# Altium PCB ledcube_v2.PcbDoc (part 16 of 18)
Units mil, origin at the board's own origin, x right, y up, seen from the top; angles counter-clockwise.
Board outline 3130 x 3300 mil, 2 copper layers (Top Layer, Bottom Layer); 188 components, 216 nets, 29515 pads, 250 vias.
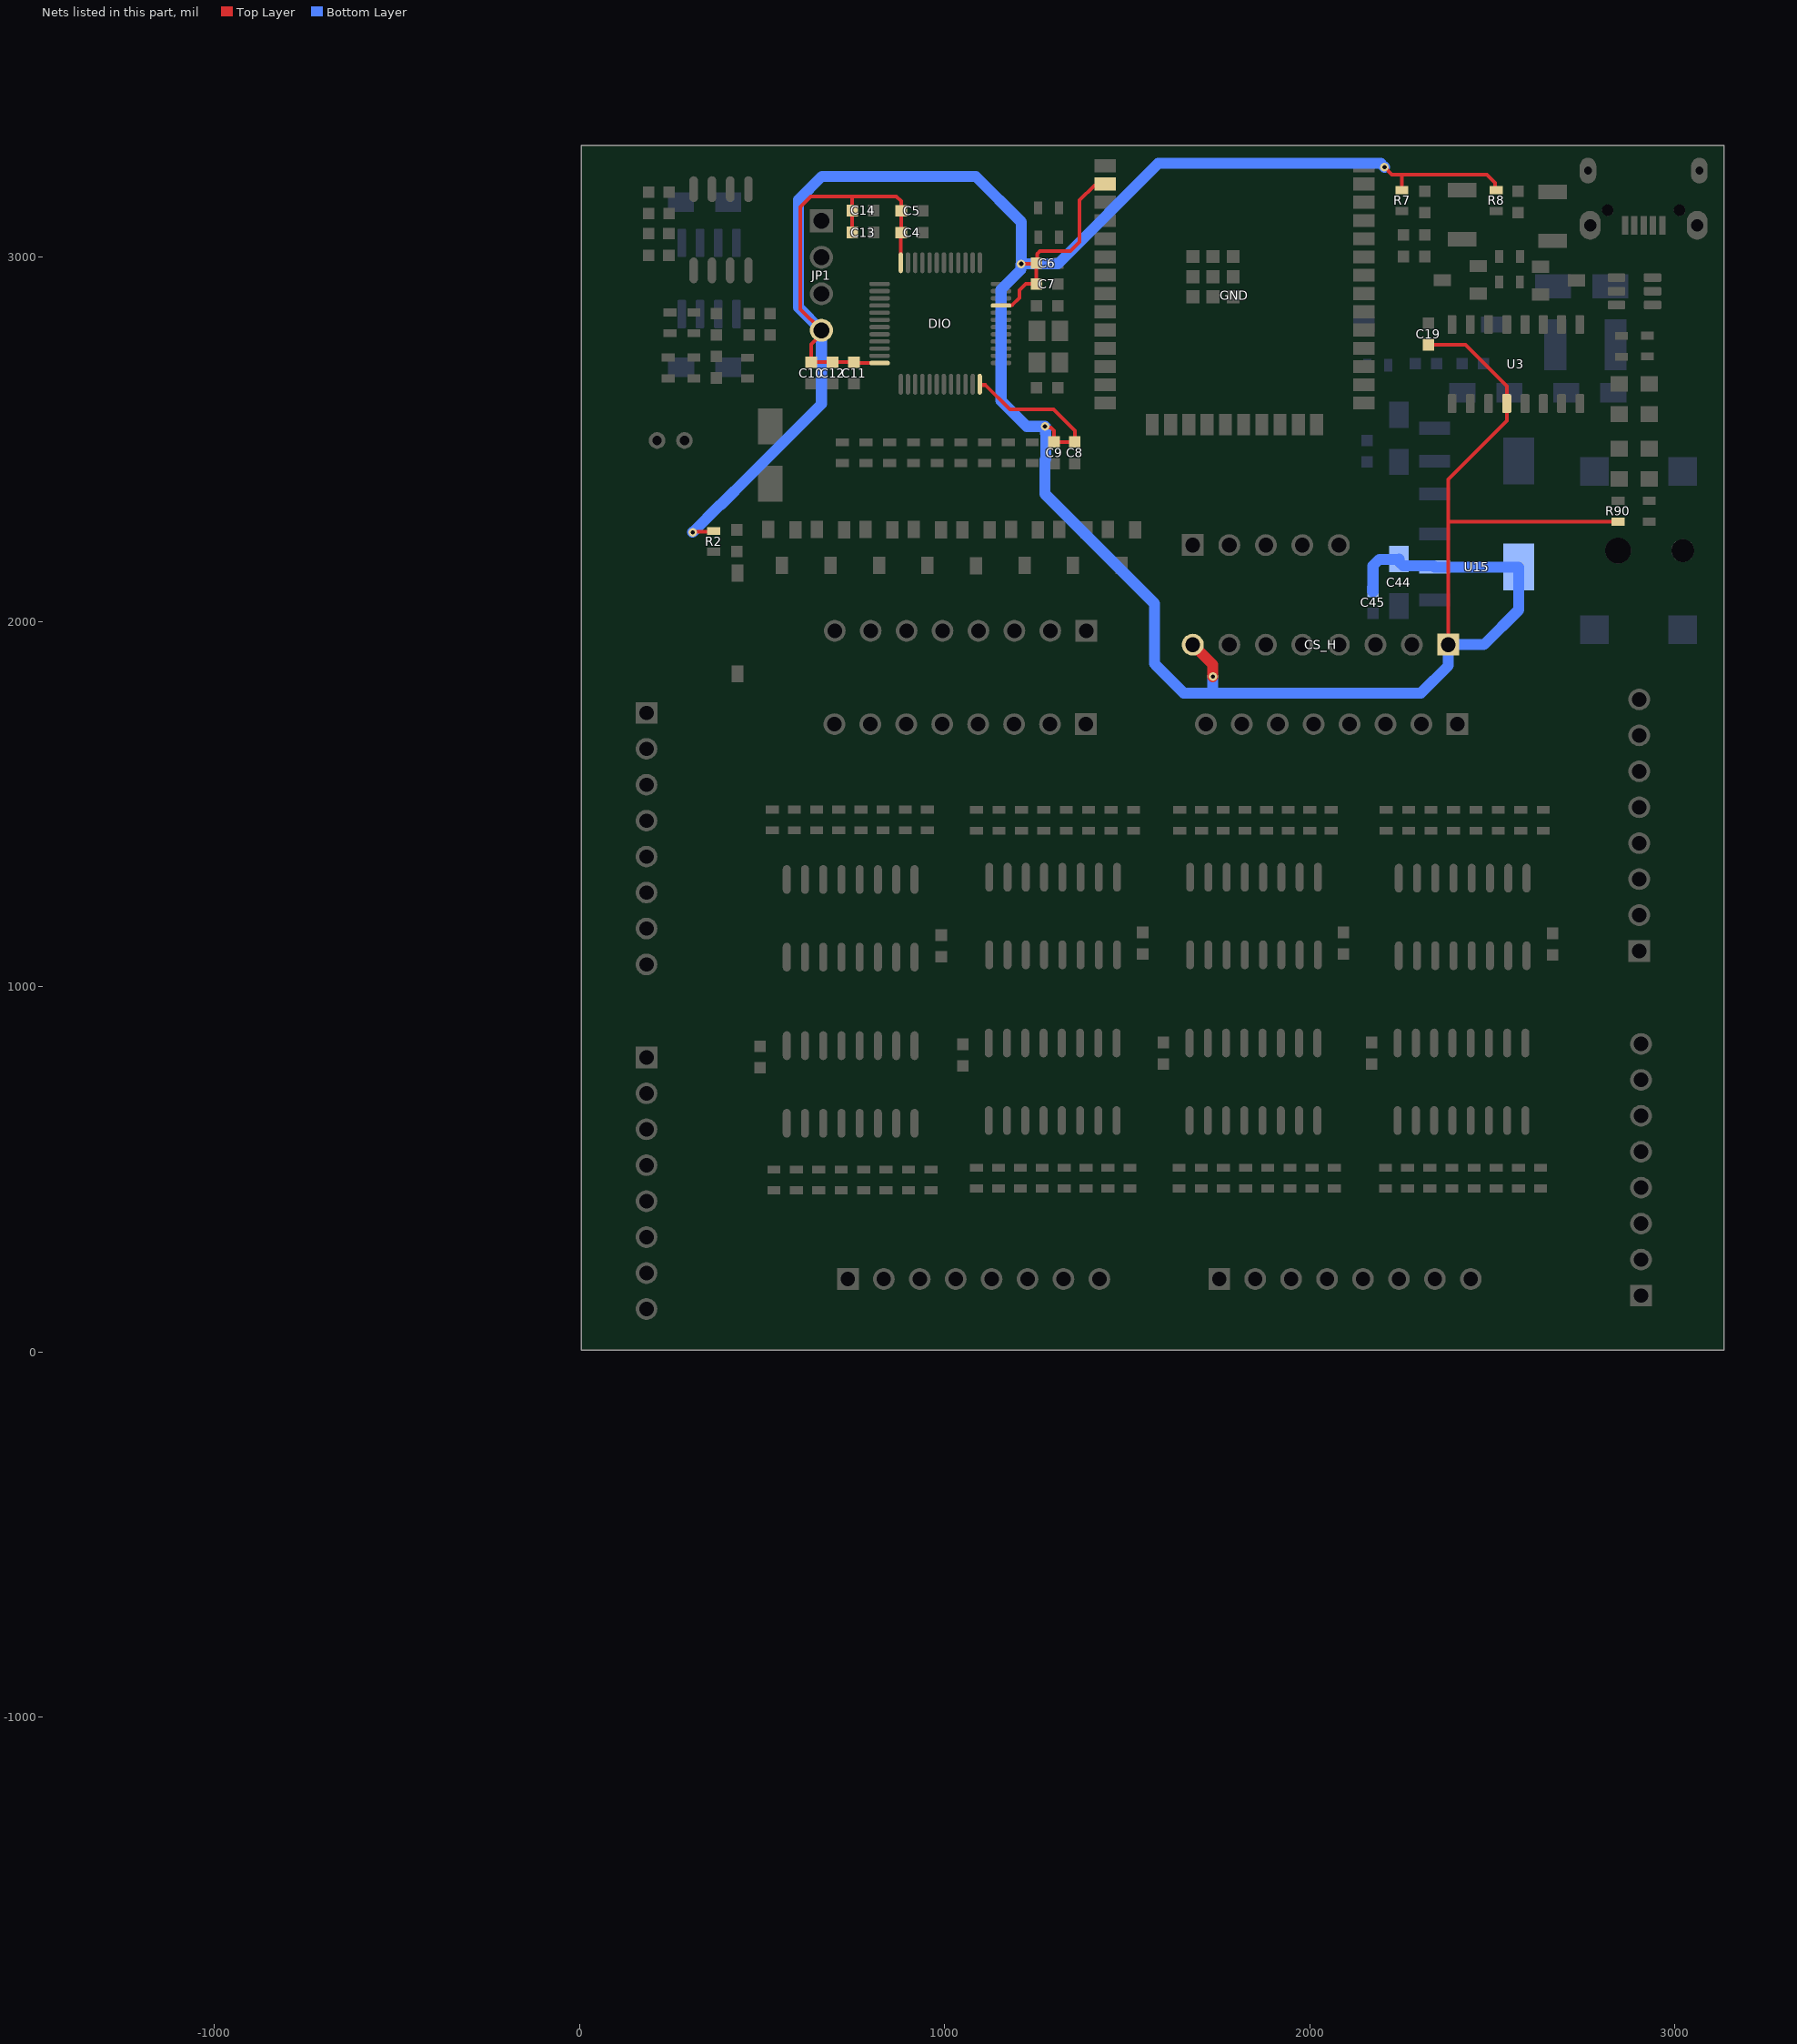
[diagram p15: the nets of this part, all layers, seen from the top]

## Free pads (board coordinates) (continued)
  round 0 on Mech16: 1(-1371.52,-1737.2) 1(-1371.52,-1737.2) 1(-1371.52,-1737.17) 1(-1371.52,-1737.17) 1(-1371.52,-1737.16) 1(-1371.52,-1737.16) 1(-1371.52,-1737.17) 1(-1371.52,-1737.17) 1(-1371.52,-1737.2) 1(-1371.52,-1737.2) 1(-1371.52,-1737.15) 1(-1371.52,-1737.15) 1(-1371.52,-1737.21) 1(-1371.52,-1737.21) 1(-1371.52,-1737.24) 1(-1371.52,-1737.24) 1(-1371.52,-1737.21) 1(-1371.52,-1737.21) 1(-1371.52,-1737.23) 1(-1371.52,-1737.23) 1(-1371.52,-1737.23) 1(-1371.52,-1737.23) 1(-1371.52,-1737.23) 1(-1371.52,-1737.23) 1(-1371.52,-1737.26) 1(-1371.52,-1737.26) 1(-1371.52,-1737.26) 1(-1371.52,-1737.26) 1(-1371.52,-1737.25) 1(-1371.52,-1737.25) 1(-1371.52,-1737.19) 1(-1371.52,-1737.19) 1(-1371.52,-1737.18) 1(-1371.52,-1737.18) 1(-1371.52,-1737.22) 1(-1371.52,-1737.22) 1(-1371.52,-1737.21) 1(-1371.52,-1737.21) 1(-1371.52,-1737.21) 1(-1371.52,-1737.21) 1(-1371.52,-1737.2) 1(-1371.52,-1737.2) 1(-1371.52,-1737.16) 1(-1371.52,-1737.16) 1(-1371.52,-1737.17) 1(-1371.52,-1737.17) 1(-1371.52,-1737.21) 1(-1371.52,-1737.21) 1(-1371.52,-1737.23) 1(-1371.52,-1737.23) 1(-1371.52,-1737.22) 1(-1371.52,-1737.22) 1(-1371.52,-1737.2) 1(-1371.52,-1737.2) 1(-1371.52,-1737.19) 1(-1371.52,-1737.19) 1(-1371.52,-1737.18) 1(-1371.52,-1737.18) 1(-1371.52,-1737.16) 1(-1371.52,-1737.16) 1(-1371.52,-1737.24) 1(-1371.52,-1737.24) 1(-1371.52,-1737.16) 1(-1371.52,-1737.16) 1(-1371.52,-1737.21) 1(-1371.52,-1737.21) 1(-1371.52,-1737.2) 1(-1371.52,-1737.2) 1(-1371.52,-1737.26) 1(-1371.52,-1737.26) 1(-1371.52,-1737.26) 1(-1371.52,-1737.26) 1(-1371.51,-1737.21) 1(-1371.51,-1737.21) 1(-1371.51,-1737.23) 1(-1371.51,-1737.23) 1(-1371.51,-1737.16) 1(-1371.51,-1737.16) 1(-1371.51,-1737.26) 1(-1371.51,-1737.26) 1(-1371.51,-1737.26) 1(-1371.51,-1737.26) 1(-1371.51,-1737.22) 1(-1371.51,-1737.22) 1(-1371.51,-1737.18) 1(-1371.51,-1737.18) 1(-1371.51,-1737.24) 1(-1371.51,-1737.24) 1(-1371.51,-1737.2) 1(-1371.51,-1737.2) 1(-1371.51,-1737.19) 1(-1371.51,-1737.19) 1(-1371.51,-1737.19) 1(-1371.51,-1737.19) 1(-1371.51,-1737.17) 1(-1371.51,-1737.17) 1(-1371.51,-1737.21) 1(-1371.51,-1737.21) 1(-1371.51,-1737.19) 1(-1371.51,-1737.19) 1(-1371.51,-1737.18) 1(-1371.51,-1737.18) 1(-1371.51,-1737.25) 1(-1371.51,-1737.25) 1(-1371.51,-1737.17) 1(-1371.51,-1737.17) 1(-1371.51,-1737.26) 1(-1371.51,-1737.26) 1(-1371.51,-1737.16) 1(-1371.51,-1737.16) 1(-1371.51,-1737.22) 1(-1371.51,-1737.22) 1(-1371.51,-1737.19) 1(-1371.51,-1737.19) 1(-1371.51,-1737.25) 1(-1371.51,-1737.25) 1(-1371.51,-1737.21) 1(-1371.51,-1737.21) 1(-1371.51,-1737.2) 1(-1371.51,-1737.2) 1(-1371.51,-1737.19) 1(-1371.51,-1737.19) 1(-1371.51,-1737.18) 1(-1371.51,-1737.18) 1(-1371.51,-1737.26) 1(-1371.51,-1737.26) 1(-1371.51,-1737.26) 1(-1371.51,-1737.26) 1(-1371.51,-1737.18) 1(-1371.51,-1737.18) 1(-1371.51,-1737.15) 1(-1371.51,-1737.15) 1(-1371.51,-1737.21) 1(-1371.51,-1737.21) 1(-1371.51,-1737.2) 1(-1371.51,-1737.2) 1(-1371.51,-1737.19) 1(-1371.51,-1737.19) 1(-1371.51,-1737.19) 1(-1371.51,-1737.19) 1(-1371.51,-1737.17) 1(-1371.51,-1737.17) 1(-1371.51,-1737.21) 1(-1371.51,-1737.21) 1(-1371.51,-1737.26) 1(-1371.51,-1737.26) 1(-1371.51,-1737.18) 1(-1371.51,-1737.18) 1(-1371.51,-1737.25) 1(-1371.51,-1737.25) 1(-1371.51,-1737.18) 1(-1371.51,-1737.18) 1(-1371.51,-1737.16) 1(-1371.51,-1737.16) 1(-1371.51,-1737.19) 1(-1371.51,-1737.19) 1(-1371.51,-1737.17) 1(-1371.51,-1737.17) 1(-1371.51,-1737.15) 1(-1371.51,-1737.15) 1(-1371.51,-1737.26) 1(-1371.51,-1737.26) 1(-1371.51,-1737.18) 1(-1371.51,-1737.18) 1(-1371.51,-1737.19) 1(-1371.51,-1737.19) 1(-1371.51,-1737.19) 1(-1371.51,-1737.19) 1(-1371.51,-1737.22) 1(-1371.51,-1737.22) 1(-1371.51,-1737.18) 1(-1371.51,-1737.18) 1(-1371.51,-1737.17) 1(-1371.51,-1737.17) 1(-1371.51,-1737.26) 1(-1371.51,-1737.26) 1(-1371.51,-1737.21) 1(-1371.51,-1737.21) 1(-1371.51,-1737.21) 1(-1371.51,-1737.21) 1(-1371.51,-1737.19) 1(-1371.51,-1737.19) 1(-1371.51,-1737.2) 1(-1371.51,-1737.2) 1(-1371.51,-1737.18) 1(-1371.51,-1737.18) 1(-1371.51,-1737.18) 1(-1371.51,-1737.18) 1(-1371.51,-1737.16) 1(-1371.51,-1737.16) 1(-1371.51,-1737.19) 1(-1371.51,-1737.19) 1(-1371.51,-1737.17) 1(-1371.51,-1737.17) 1(-1371.51,-1737.18) 1(-1371.51,-1737.18) 1(-1371.51,-1737.26) 1(-1371.51,-1737.26) 1(-1371.51,-1737.18) 1(-1371.51,-1737.18) 1(-1371.51,-1737.18) 1(-1371.51,-1737.18) 1(-1371.51,-1737.19) 1(-1371.51,-1737.19) 1(-1371.51,-1737.16) 1(-1371.51,-1737.16) 1(-1371.51,-1737.21) 1(-1371.51,-1737.21) 1(-1371.51,-1737.21) 1(-1371.51,-1737.21) 1(-1371.51,-1737.16) 1(-1371.51,-1737.16) 1(-1371.51,-1737.17) 1(-1371.51,-1737.17) 1(-1371.51,-1737.18) 1(-1371.51,-1737.18) 1(-1371.51,-1737.19) 1(-1371.51,-1737.19) 1(-1371.51,-1737.2) 1(-1371.51,-1737.2) 1(-1371.51,-1737.16) 1(-1371.51,-1737.16) 1(-1371.5,-1737.18) 1(-1371.5,-1737.18) 1(-1371.5,-1737.16) 1(-1371.5,-1737.16) 1(-1371.5,-1737.29) 1(-1371.5,-1737.29) 1(-1371.5,-1737.21) 1(-1371.5,-1737.21) 1(-1371.5,-1737.15) 1(-1371.5,-1737.15) 1(-1371.5,-1737.26) 1(-1371.5,-1737.26) 1(-1371.5,-1737.25) 1(-1371.5,-1737.25) 1(-1371.5,-1737.18) 1(-1371.5,-1737.18) 1(-1371.5,-1737.19) 1(-1371.5,-1737.19) 1(-1371.5,-1737.17) 1(-1371.5,-1737.17) 1(-1371.5,-1737.2) 1(-1371.5,-1737.2) 1(-1371.5,-1737.15) 1(-1371.5,-1737.15) 1(-1371.5,-1737.21) 1(-1371.5,-1737.21) 1(-1371.5,-1737.19) 1(-1371.5,-1737.19) 1(-1371.5,-1737.21) 1(-1371.5,-1737.21) 1(-1371.5,-1737.17) 1(-1371.5,-1737.17) 1(-1371.5,-1737.18) 1(-1371.5,-1737.18) 1(-1371.5,-1737.28) 1(-1371.5,-1737.28) 1(-1371.5,-1737.2) 1(-1371.5,-1737.2) 1(-1371.5,-1737.19) 1(-1371.5,-1737.19) 1(-1371.5,-1737.2) 1(-1371.5,-1737.2) 1(-1371.5,-1737.26) 1(-1371.5,-1737.26) 1(-1371.5,-1737.17) 1(-1371.5,-1737.17) 1(-1371.5,-1737.27) 1(-1371.5,-1737.27) 1(-1371.5,-1737.2) 1(-1371.5,-1737.2) 1(-1371.5,-1737.15) 1(-1371.5,-1737.15) 1(-1371.5,-1737.18) 1(-1371.5,-1737.18) 1(-1371.5,-1737.21) 1(-1371.5,-1737.21) 1(-1371.5,-1737.16) 1(-1371.5,-1737.16) 1(-1371.5,-1737.2) 1(-1371.5,-1737.2) 1(-1371.5,-1737.26) 1(-1371.5,-1737.26) 1(-1371.5,-1737.19) 1(-1371.5,-1737.19) 1(-1371.5,-1737.17) 1(-1371.5,-1737.17) 1(-1371.5,-1737.21) 1(-1371.5,-1737.21) 1(-1371.5,-1737.21) 1(-1371.5,-1737.21) 1(-1371.5,-1737.17) 1(-1371.5,-1737.17) 1(-1371.5,-1737.26) 1(-1371.5,-1737.26) 1(-1371.5,-1737.21) 1(-1371.5,-1737.21) 1(-1371.5,-1737.27) 1(-1371.5,-1737.27) 1(-1371.5,-1737.21) 1(-1371.5,-1737.21) 1(-1371.5,-1737.18) 1(-1371.5,-1737.18) 1(-1371.5,-1737.2) 1(-1371.5,-1737.2) 1(-1371.5,-1737.19) 1(-1371.5,-1737.19) 1(-1371.5,-1737.17) 1(-1371.5,-1737.17) 1(-1371.5,-1737.19) 1(-1371.5,-1737.19) 1(-1371.5,-1737.16) 1(-1371.5,-1737.16) 1(-1371.5,-1737.15) 1(-1371.5,-1737.15) 1(-1371.5,-1737.2) 1(-1371.5,-1737.2) 1(-1371.49,-1737.18) 1(-1371.49,-1737.18) 1(-1371.49,-1737.26) 1(-1371.49,-1737.26) 1(-1371.49,-1737.21) 1(-1371.49,-1737.21) 1(-1371.49,-1737.17) 1(-1371.49,-1737.17) 1(-1371.49,-1737.26) 1(-1371.49,-1737.26) 1(-1371.49,-1737.21) 1(-1371.49,-1737.21) 1(-1371.49,-1737.21) 1(-1371.49,-1737.21) 1(-1371.49,-1737.17) 1(-1371.49,-1737.17) 1(-1371.49,-1737.2) 1(-1371.49,-1737.2) 1(-1371.49,-1737.19) 1(-1371.49,-1737.19) 1(-1371.49,-1737.21) 1(-1371.49,-1737.21) 1(-1371.49,-1737.26) 1(-1371.49,-1737.26) 1(-1371.49,-1737.2) 1(-1371.49,-1737.2) 1(-1371.49,-1737.17) 1(-1371.49,-1737.17) 1(-1371.49,-1737.19) 1(-1371.49,-1737.19) 1(-1371.49,-1737.16) 1(-1371.49,-1737.16) 1(-1371.49,-1737.19) 1(-1371.49,-1737.19) 1(-1371.49,-1735.85) 1(-1371.49,-1735.85) 1(-1371.49,-1735.75) 1(-1371.49,-1735.75) 1(-1371.49,-1735.74) 1(-1371.49,-1735.74) 1(-1371.49,-1737.27) 1(-1371.49,-1737.27) 1(-1371.49,-1737.27) 1(-1371.49,-1737.27) 1(-1371.49,-1737.21) 1(-1371.49,-1737.21) 1(-1371.49,-1737.28) 1(-1371.49,-1737.28) 1(-1371.49,-1737.18) 1(-1371.49,-1737.18) 1(-1371.49,-1737.17) 1(-1371.49,-1737.17) 1(-1371.49,-1737.2) 1(-1371.49,-1737.2) 1(-1371.49,-1737.19) 1(-1371.49,-1737.19) 1(-1371.49,-1737.28) 1(-1371.49,-1737.28) 1(-1371.49,-1737.19) 1(-1371.49,-1737.19) 1(-1371.49,-1737.18) 1(-1371.49,-1737.18) 1(-1371.49,-1737.2) 1(-1371.49,-1737.2) 1(-1371.49,-1737.26) 1(-1371.49,-1737.26) 1(-1371.49,-1737.18) 1(-1371.49,-1737.18) 1(-1371.49,-1737.21) 1(-1371.49,-1737.21) 1(-1371.49,-1737.17) 1(-1371.49,-1737.17) 1(-1371.49,-1737.21) 1(-1371.49,-1737.21) 1(-1371.49,-1737.16) 1(-1371.49,-1737.16) 1(-1371.49,-1737.29) 1(-1371.49,-1737.29) 1(-1371.49,-1737.26) 1(-1371.49,-1737.26) 1(-1371.49,-1735.58) 1(-1371.49,-1735.58) 1(-1371.49,-1735.53) 1(-1371.49,-1735.53) 1(-1371.49,-1737.26) 1(-1371.49,-1737.26) 1(-1371.49,-1737.17) 1(-1371.49,-1737.17) 1(-1371.49,-1737.2) 1(-1371.49,-1737.2) 1(-1371.49,-1737.19) 1(-1371.49,-1737.19) 1(-1371.49,-1737.27) 1(-1371.49,-1737.27) 1(-1371.49,-1737.18) 1(-1371.49,-1737.18) 1(-1371.49,-1737.18) 1(-1371.49,-1737.18) 1(-1371.49,-1737.2) 1(-1371.49,-1737.2) 1(-1371.49,-1737.18) 1(-1371.49,-1737.18) 1(-1371.48,-1737.16) 1(-1371.48,-1737.16) 1(-1371.48,-1737.26) 1(-1371.48,-1737.26) 1(-1371.48,-1737.16) 1(-1371.48,-1737.16) 1(-1371.48,-1737.19) 1(-1371.48,-1737.19) 1(-1371.48,-1737.29) 1(-1371.48,-1737.29) 1(-1371.48,-1737.27) 1(-1371.48,-1737.27) 1(-1371.48,-1737.26) 1(-1371.48,-1737.26) 1(-1371.48,-1737.21) 1(-1371.48,-1737.21) 1(-1371.48,-1737.16) 1(-1371.48,-1737.16) 1(-1371.48,-1737.19) 1(-1371.48,-1737.19) 1(-1371.48,-1737.15) 1(-1371.48,-1737.15) 1(-1371.48,-1737.27) 1(-1371.48,-1737.27) 1(-1371.48,-1737.26) 1(-1371.48,-1737.26) 1(-1371.48,-1737.27) 1(-1371.48,-1737.27) 1(-1371.48,-1737.19) 1(-1371.48,-1737.19) 1(-1371.48,-1737.21) 1(-1371.48,-1737.21) 1(-1371.48,-1737.26) 1(-1371.48,-1737.26) 1(-1371.48,-1737.17) 1(-1371.48,-1737.17) 1(-1371.48,-1737.27) 1(-1371.48,-1737.27) 1(-1371.48,-1737.21) 1(-1371.48,-1737.21) 1(-1371.48,-1737.19) 1(-1371.48,-1737.19) 1(-1371.48,-1737.26) 1(-1371.48,-1737.26) 1(-1371.48,-1737.16) 1(-1371.48,-1737.16) 1(-1371.48,-1737.18) 1(-1371.48,-1737.18) 1(-1371.48,-1737.19) 1(-1371.48,-1737.19) 1(-1371.48,-1737.18) 1(-1371.48,-1737.18) 1(-1371.48,-1737.27) 1(-1371.48,-1737.27) 1(-1371.48,-1737.21) 1(-1371.48,-1737.21) 1(-1371.48,-1737.27) 1(-1371.48,-1737.27) 1(-1371.48,-1737.27) 1(-1371.48,-1737.27) 1(-1371.48,-1737.26) 1(-1371.48,-1737.26) 1(-1371.48,-1737.21) 1(-1371.48,-1737.21) 1(-1371.48,-1737.25) 1(-1371.48,-1737.25) 1(-1371.48,-1737.18) 1(-1371.48,-1737.18) 1(-1371.48,-1737.17) 1(-1371.48,-1737.17) 1(-1371.48,-1737.27) 1(-1371.48,-1737.27) 1(-1371.48,-1737.26) 1(-1371.48,-1737.26) 1(-1371.48,-1737.26) 1(-1371.48,-1737.26) 1(-1371.47,-1737.26) 1(-1371.47,-1737.26) 1(-1371.47,-1737.22) 1(-1371.47,-1737.22) 1(-1371.47,-1736.26) 1(-1371.47,-1736.26) 1(-1371.47,-1736.15) 1(-1371.47,-1736.15) 1(-1371.47,-1737.27) 1(-1371.47,-1737.27) 1(-1371.47,-1737.26) 1(-1371.47,-1737.26) 1(-1371.47,-1737.25) 1(-1371.47,-1737.25) 1(-1371.47,-1737.27) 1(-1371.47,-1737.27) 1(-1371.47,-1737.26) 1(-1371.47,-1737.26) 1(-1371.47,-1737.25) 1(-1371.47,-1737.25) 1(-1371.47,-1737.27) 1(-1371.47,-1737.27) 1(-1371.47,-1737.22) 1(-1371.47,-1737.22) 1(-1371.47,-1737.27) 1(-1371.47,-1737.27) 1(-1371.47,-1737.26) 1(-1371.47,-1737.26) 1(-1371.47,-1737.17) 1(-1371.47,-1737.17) 1(-1371.47,-1737.26) 1(-1371.47,-1737.26) 1(-1371.47,-1737.27) 1(-1371.47,-1737.27) 1(-1371.47,-1737.16) 1(-1371.47,-1737.16) 1(-1371.47,-1737.22) 1(-1371.47,-1737.22) 1(-1371.47,-1737.26) 1(-1371.47,-1737.26) 1(-1371.47,-1737.26) 1(-1371.47,-1737.26) 1(-1371.47,-1737.26) 1(-1371.47,-1737.26) 1(-1371.47,-1737.25) 1(-1371.47,-1737.25) 1(-1371.47,-1737.24) 1(-1371.47,-1737.24) 1(-1371.47,-1737.22) 1(-1371.47,-1737.22) 1(-1371.47,-1737.22) 1(-1371.47,-1737.22) 1(-1371.47,-1737.16) 1(-1371.47,-1737.16) 1(-1371.47,-1737.27) 1(-1371.47,-1737.27) 1(-1371.47,-1737.16) 1(-1371.47,-1737.16) 1(-1371.47,-1737.16) 1(-1371.47,-1737.16) 1(-1371.47,-1737.27) 1(-1371.47,-1737.27) 1(-1371.47,-1737.22) 1(-1371.47,-1737.22) 1(-1371.47,-1737.24) 1(-1371.47,-1737.24) 1(-1371.47,-1737.23) 1(-1371.47,-1737.23) 1(-1371.47,-1737.24) 1(-1371.47,-1737.24) 1(-1371.47,-1737.27) 1(-1371.47,-1737.27) 1(-1371.47,-1737.26) 1(-1371.47,-1737.26) 1(-1371.47,-1737.22) 1(-1371.47,-1737.22) 1(-1371.47,-1737.26) 1(-1371.47,-1737.26) 1(-1371.47,-1737.23) 1(-1371.47,-1737.23) 1(-1371.47,-1737.24) 1(-1371.47,-1737.24) 1(-1371.47,-1737.16) 1(-1371.47,-1737.16) 1(-1371.47,-1737.16) 1(-1371.47,-1737.16) 1(-1371.47,-1737.25) 1(-1371.47,-1737.25) 1(-1371.47,-1737.17) 1(-1371.47,-1737.17) 1(-1371.47,-1737.16) 1(-1371.47,-1737.16) 1(-1371.47,-1737.29) 1(-1371.47,-1737.29) 1(-1371.47,-1737.27) 1(-1371.47,-1737.27) 1(-1371.47,-1737.24) 1(-1371.47,-1737.24) 1(-1371.47,-1737.24) 1(-1371.47,-1737.24) 1(-1371.47,-1737.26) 1(-1371.47,-1737.26) 1(-1371.46,-1737.23) 1(-1371.46,-1737.23) 1(-1371.46,-1737.17) 1(-1371.46,-1737.17) 1(-1371.46,-1737.15) 1(-1371.46,-1737.15) 1(-1371.46,-1737.23) 1(-1371.46,-1737.23) 1(-1371.46,-1737.16) 1(-1371.46,-1737.16) 1(-1371.46,-1737.26) 1(-1371.46,-1737.26) 1(-1371.46,-1737.26) 1(-1371.46,-1737.26) 1(-1371.46,-1737.23) 1(-1371.46,-1737.23) 1(-1371.46,-1737.16) 1(-1371.46,-1737.16) 1(-1371.46,-1737.16) 1(-1371.46,-1737.16) 1(-1371.46,-1737.26) 1(-1371.46,-1737.26) 1(-1371.46,-1737.26) 1(-1371.46,-1737.26) 1(-1371.46,-1737.17) 1(-1371.46,-1737.17) 1(-1371.46,-1737.26) 1(-1371.46,-1737.26) 1(-1371.46,-1737.16) 1(-1371.46,-1737.16) 1(-1371.46,-1737.16) 1(-1371.46,-1737.16) 1(-1371.46,-1737.26) 1(-1371.46,-1737.26) 1(-1371.46,-1737.27) 1(-1371.46,-1737.27) 1(-1371.46,-1737.26) 1(-1371.46,-1737.26) 1(-1371.46,-1737.28) 1(-1371.46,-1737.28) 1(-1371.46,-1737.16) 1(-1371.46,-1737.16) 1(-1371.46,-1737.23) 1(-1371.46,-1737.23) 1(-1371.46,-1737.23) 1(-1371.46,-1737.23) 1(-1371.46,-1737.26) 1(-1371.46,-1737.26) 1(-1371.46,-1737.28) 1(-1371.46,-1737.28) 1(-1371.46,-1737.23) 1(-1371.46,-1737.23) 1(-1371.46,-1737.26) 1(-1371.46,-1737.26) 1(-1371.46,-1737.16) 1(-1371.46,-1737.16) 1(-1371.46,-1737.27) 1(-1371.46,-1737.27) 1(-1371.46,-1737.26) 1(-1371.46,-1737.26) 1(-1371.46,-1737.24) 1(-1371.46,-1737.24) 1(-1371.46,-1737.28) 1(-1371.46,-1737.28) 1(-1371.46,-1737.23) 1(-1371.46,-1737.23) 1(-1371.46,-1737.26) 1(-1371.46,-1737.26) 1(-1371.46,-1737.15) 1(-1371.46,-1737.15) 1(-1371.46,-1737.27) 1(-1371.46,-1737.27) 1(-1371.46,-1737.23) 1(-1371.46,-1737.23) 1(-1371.46,-1737.23) 1(-1371.46,-1737.23) 1(-1371.45,-1737.26) 1(-1371.45,-1737.26) 1(-1371.45,-1737.26) 1(-1371.45,-1737.26) 1(-1371.45,-1737.23) 1(-1371.45,-1737.23) 1(-1371.45,-1737.26) 1(-1371.45,-1737.26) 1(-1371.45,-1737.16) 1(-1371.45,-1737.16) 1(-1371.45,-1737.15) 1(-1371.45,-1737.15) 1(-1371.45,-1737.29) 1(-1371.45,-1737.29) 1(-1371.45,-1737.28) 1(-1371.45,-1737.28) 1(-1371.45,-1737.27) 1(-1371.45,-1737.27) 1(-1371.45,-1737.15) 1(-1371.45,-1737.15) 1(-1371.45,-1737.26) 1(-1371.45,-1737.26) 1(-1371.45,-1737.14) 1(-1371.45,-1737.14) 1(-1371.45,-1737.14) 1(-1371.45,-1737.14) 1(-1371.45,-1737.24) 1(-1371.45,-1737.24) 1(-1371.45,-1737.28) 1(-1371.45,-1737.28) 1(-1371.45,-1737.28) 1(-1371.45,-1737.28) 1(-1371.45,-1737.14) 1(-1371.45,-1737.14) 1(-1371.45,-1737.24) 1(-1371.45,-1737.24) 1(-1371.45,-1737.28) 1(-1371.45,-1737.28) 1(-1371.45,-1737.16) 1(-1371.45,-1737.16) 1(-1371.45,-1737.28) 1(-1371.45,-1737.28) 1(-1371.45,-1737.26) 1(-1371.45,-1737.26) 1(-1371.45,-1737.28) 1(-1371.45,-1737.28) 1(-1371.45,-1737.14) 1(-1371.45,-1737.14) 1(-1371.45,-1737.15) 1(-1371.45,-1737.15) 1(-1371.45,-1737.26) 1(-1371.45,-1737.26) 1(-1371.45,-1737.15) 1(-1371.45,-1737.15) 1(-1371.45,-1737.15) 1(-1371.45,-1737.15) 1(-1371.45,-1737.24) 1(-1371.45,-1737.24) 1(-1371.45,-1737.24) 1(-1371.45,-1737.24) 1(-1371.45,-1737.14) 1(-1371.45,-1737.14) 1(-1371.45,-1737.15) 1(-1371.45,-1737.15) 1(-1371.44,-1737.15) 1(-1371.44,-1737.15) 1(-1371.44,-1735.85) 1(-1371.44,-1735.85) 1(-1371.44,-1735.74) 1(-1371.44,-1735.74) 1(-1371.44,-1737.26) 1(-1371.44,-1737.26) 1(-1371.44,-1737.23) 1(-1371.44,-1737.23) 1(-1371.44,-1737.14) 1(-1371.44,-1737.14) 1(-1371.44,-1737.24) 1(-1371.44,-1737.24) 1(-1371.44,-1737.24) 1(-1371.44,-1737.24) 1(-1371.44,-1737.23) 1(-1371.44,-1737.23) 1(-1371.44,-1737.25) 1(-1371.44,-1737.25) 1(-1371.44,-1737.24) 1(-1371.44,-1737.24) 1(-1371.44,-1737.14) 1(-1371.44,-1737.14) 1(-1371.44,-1737.26) 1(-1371.44,-1737.26) 1(-1371.44,-1737.15) 1(-1371.44,-1737.15) 1(-1371.44,-1737.29) 1(-1371.44,-1737.29) 1(-1371.44,-1737.26) 1(-1371.44,-1737.26) 1(-1371.44,-1737.15) 1(-1371.44,-1737.15) 1(-1371.44,-1737.24) 1(-1371.44,-1737.24) 1(-1371.44,-1737.24) 1(-1371.44,-1737.24) 1(-1371.44,-1737.26) 1(-1371.44,-1737.26) 1(-1371.44,-1737.26) 1(-1371.44,-1737.26) 1(-1371.44,-1737.26) 1(-1371.44,-1737.26) 1(-1371.44,-1737.26) 1(-1371.44,-1737.26) 1(-1371.44,-1737.26) 1(-1371.44,-1737.26) 1(-1371.44,-1737.24) 1(-1371.44,-1737.24) 1(-1371.44,-1737.14) 1(-1371.44,-1737.14) 1(-1371.44,-1737.26) 1(-1371.44,-1737.26) 1(-1371.44,-1737.14) 1(-1371.44,-1737.14) 1(-1371.44,-1737.26) 1(-1371.44,-1737.26) 1(-1371.43,-1737.15) 1(-1371.43,-1737.15) 1(-1371.43,-1737.25) 1(-1371.43,-1737.25) 1(-1371.43,-1737.25) 1(-1371.43,-1737.25) 1(-1371.43,-1737.14) 1(-1371.43,-1737.14) 1(-1371.43,-1737.14) 1(-1371.43,-1737.14) 1(-1371.43,-1737.25) 1(-1371.43,-1737.25) 1(-1371.43,-1737.24) 1(-1371.43,-1737.24) 1(-1371.43,-1737.26) 1(-1371.43,-1737.26) 1(-1371.43,-1737.24) 1(-1371.43,-1737.24) 1(-1371.43,-1737.24) 1(-1371.43,-1737.24) 1(-1371.43,-1737.14) 1(-1371.43,-1737.14) 1(-1371.43,-1737.13) 1(-1371.43,-1737.13) 1(-1371.43,-1737.24) 1(-1371.43,-1737.24) 1(-1371.43,-1736.26) 1(-1371.43,-1736.26) 1(-1371.43,-1736.25) 1(-1371.43,-1736.25) 1(-1371.43,-1736.15) 1(-1371.43,-1736.15) 1(-1371.43,-1737.24) 1(-1371.43,-1737.24) 1(-1371.43,-1737.25) 1(-1371.43,-1737.25) 1(-1371.43,-1737.15) 1(-1371.43,-1737.15) 1(-1371.42,-1737.14) 1(-1371.42,-1737.14) 1(-1371.42,-1737.26) 1(-1371.42,-1737.26) 1(-1371.42,-1737.24) 1(-1371.42,-1737.24) 1(-1371.42,-1737.14) 1(-1371.42,-1737.14) 1(-1371.42,-1737.14) 1(-1371.42,-1737.14) 1(-1371.42,-1737.28) 1(-1371.42,-1737.28) 1(-1371.42,-1737.14) 1(-1371.42,-1737.14) 1(-1371.42,-1737.25) 1(-1371.42,-1737.25) 1(-1371.42,-1737.25) 1(-1371.42,-1737.25) 1(-1371.42,-1737.27) 1(-1371.42,-1737.27) 1(-1371.42,-1737.14) 1(-1371.42,-1737.14) 1(-1371.42,-1737.14) 1(-1371.42,-1737.14) 1(-1371.42,-1737.14) 1(-1371.42,-1737.14) 1(-1371.42,-1737.13) 1(-1371.42,-1737.13) 1(-1371.42,-1737.25) 1(-1371.42,-1737.25) 1(-1371.42,-1737.25) 1(-1371.42,-1737.25) 1(-1371.42,-1737.24) 1(-1371.42,-1737.24) 1(-1371.42,-1737.24) 1(-1371.42,-1737.24) 1(-1371.42,-1737.14) 1(-1371.42,-1737.14) 1(-1371.42,-1737.24) 1(-1371.42,-1737.24) 1(-1371.42,-1737.26) 1(-1371.42,-1737.26) 1(-1371.42,-1737.25) 1(-1371.42,-1737.25) 1(-1371.42,-1737.25) 1(-1371.42,-1737.25) 1(-1371.42,-1737.24) 1(-1371.42,-1737.24) 1(-1371.42,-1737.13) 1(-1371.42,-1737.13) 1(-1371.42,-1737.26) 1(-1371.42,-1737.26) 1(-1371.41,-1737.26) 1(-1371.41,-1737.26) 1(-1371.41,-1737.25) 1(-1371.41,-1737.25) 1(-1371.41,-1737.24) 1(-1371.41,-1737.24) 1(-1371.41,-1737.27) 1(-1371.41,-1737.27) 1(-1371.41,-1737.26) 1(-1371.41,-1737.26) 1(-1371.41,-1737.14) 1(-1371.41,-1737.14) 1(-1371.41,-1737.27) 1(-1371.41,-1737.27) 1(-1371.41,-1737.14) 1(-1371.41,-1737.14) 1(-1371.41,-1737.24) 1(-1371.41,-1737.24) 1(-1371.41,-1737.24) 1(-1371.41,-1737.24) 1(-1371.41,-1737.15) 1(-1371.41,-1737.15) 1(-1371.41,-1737.29) 1(-1371.41,-1737.29) 1(-1371.41,-1737.14) 1(-1371.41,-1737.14) 1(-1371.41,-1737.24) 1(-1371.41,-1737.24) 1(-1371.41,-1737.14) 1(-1371.41,-1737.14) 1(-1371.41,-1737.24) 1(-1371.41,-1737.24) 1(-1371.41,-1737.15) 1(-1371.41,-1737.15) 1(-1371.4,-1737.15) 1(-1371.4,-1737.15) 1(-1371.4,-1737.15) 1(-1371.4,-1737.15) 1(-1371.4,-1737.15) 1(-1371.4,-1737.15) 1(-1371.4,-1737.24) 1(-1371.4,-1737.24) 1(-1371.4,-1737.25) 1(-1371.4,-1737.25) 1(-1371.4,-1737.24) 1(-1371.4,-1737.24) 1(-1371.4,-1737.25) 1(-1371.4,-1737.25) 1(-1371.4,-1737.15) 1(-1371.4,-1737.15) 1(-1371.4,-1737.24) 1(-1371.4,-1737.24) 1(-1371.4,-1737.25) 1(-1371.4,-1737.25) 1(-1371.4,-1737.29) 1(-1371.4,-1737.29) 1(-1371.4,-1737.25) 1(-1371.4,-1737.25) 1(-1371.4,-1737.24) 1(-1371.4,-1737.24) 1(-1371.4,-1737.15) 1(-1371.4,-1737.15) 1(-1371.4,-1737.23) 1(-1371.4,-1737.23) 1(-1371.4,-1737.23) 1(-1371.4,-1737.23) 1(-1371.4,-1737.24) 1(-1371.4,-1737.24) 1(-1371.4,-1737.23) 1(-1371.4,-1737.23) 1(-1371.4,-1737.15) 1(-1371.4,-1737.15) 1(-1371.39,-1737.22) 1(-1371.39,-1737.22) 1(-1371.39,-1737.26) 1(-1371.39,-1737.26) 1(-1371.39,-1737.26) 1(-1371.39,-1737.26) 1(-1371.39,-1737.15) 1(-1371.39,-1737.15) 1(-1371.39,-1737.15) 1(-1371.39,-1737.15) 1(-1371.39,-1737.26) 1(-1371.39,-1737.26) 1(-1371.39,-1737.16) 1(-1371.39,-1737.16) 1(-1371.39,-1737.22) 1(-1371.39,-1737.22) 1(-1371.39,-1737.16) 1(-1371.39,-1737.16) 1(-1371.39,-1737.23) 1(-1371.39,-1737.23) 1(-1371.39,-1737.15) 1(-1371.39,-1737.15) 1(-1371.39,-1737.26) 1(-1371.39,-1737.26) 1(-1371.39,-1737.26) 1(-1371.39,-1737.26) 1(-1371.39,-1737.16) 1(-1371.39,-1737.16) 1(-1371.39,-1737.27) 1(-1371.39,-1737.27) 1(-1371.39,-1737.26) 1(-1371.39,-1737.26) 1(-1371.39,-1735.58) 1(-1371.39,-1735.58) 1(-1371.39,-1735.53) 1(-1371.39,-1735.53) 1(-1371.39,-1737.26) 1(-1371.39,-1737.26) 1(-1371.39,-1737.16) 1(-1371.39,-1737.16) 1(-1371.39,-1737.27) 1(-1371.39,-1737.27) 1(-1371.39,-1737.27) 1(-1371.39,-1737.27) 1(-1371.39,-1737.27) 1(-1371.39,-1737.27) 1(-1371.39,-1737.17) 1(-1371.39,-1737.17) 1(-1371.39,-1737.22) 1(-1371.39,-1737.22) 1(-1371.39,-1737.25) 1(-1371.39,-1737.25) 1(-1371.39,-1737.27) 1(-1371.39,-1737.27) 1(-1371.39,-1737.25) 1(-1371.39,-1737.25) 1(-1371.39,-1737.25) 1(-1371.39,-1737.25) 1(-1371.39,-1737.27) 1(-1371.39,-1737.27) 1(-1371.39,-1737.25) 1(-1371.39,-1737.25) 1(-1371.39,-1737.16) 1(-1371.39,-1737.16) 1(-1371.39,-1737.19) 1(-1371.39,-1737.19) 1(-1371.39,-1737.26) 1(-1371.39,-1737.26) 1(-1371.39,-1737.23) 1(-1371.39,-1737.23) 1(-1371.39,-1737.18) 1(-1371.39,-1737.18) 1(-1371.39,-1737.17) 1(-1371.39,-1737.17) 1(-1371.38,-1737.19) 1(-1371.38,-1737.19) 1(-1371.38,-1737.18) 1(-1371.38,-1737.18) 1(-1371.38,-1737.17) 1(-1371.38,-1737.17) 1(-1371.38,-1737.18) 1(-1371.38,-1737.18) 1(-1371.38,-1737.19) 1(-1371.38,-1737.19) 1(-1371.38,-1737.17) 1(-1371.38,-1737.17) 1(-1371.38,-1737.19) 1(-1371.38,-1737.19) 1(-1371.38,-1737.17) 1(-1371.38,-1737.17) 1(-1371.38,-1737.22) 1(-1371.38,-1737.22) 1(-1371.38,-1737.2) 1(-1371.38,-1737.2) 1(-1371.38,-1737.17) 1(-1371.38,-1737.17) 1(-1371.38,-1737.2) 1(-1371.38,-1737.2) 1(-1371.38,-1737.28) 1(-1371.38,-1737.28) 1(-1371.38,-1737.23) 1(-1371.38,-1737.23) 1(-1371.38,-1737.18) 1(-1371.38,-1737.18) 1(-1371.38,-1737.19) 1(-1371.38,-1737.19) 1(-1371.38,-1737.18) 1(-1371.38,-1737.18) 1(-1371.38,-1737.17) 1(-1371.38,-1737.17) 1(-1371.38,-1737.26) 1(-1371.38,-1737.26) 1(-1371.38,-1737.25) 1(-1371.38,-1737.25) 1(-1371.38,-1737.26) 1(-1371.38,-1737.26) 1(-1371.38,-1737.21) 1(-1371.38,-1737.21) 1(-1371.38,-1737.18) 1(-1371.38,-1737.18) 1(-1371.38,-1737.2) 1(-1371.38,-1737.2) 1(-1371.38,-1737.2) 1(-1371.38,-1737.2) 1(-1371.38,-1737.24) 1(-1371.38,-1737.24) 1(-1371.38,-1737.22) 1(-1371.38,-1737.22) 1(-1371.38,-1737.25) 1(-1371.38,-1737.25) 1(-1371.38,-1737.19) 1(-1371.38,-1737.19) 1(-1371.38,-1737.27) 1(-1371.38,-1737.27) 1(-1371.38,-1737.22) 1(-1371.38,-1737.22) 1(-1371.38,-1737.26) 1(-1371.38,-1737.26) 1(-1371.38,-1737.21) 1(-1371.38,-1737.21) 1(-1371.38,-1737.17) 1(-1371.38,-1737.17) 1(-1371.38,-1737.26) 1(-1371.38,-1737.26) 1(-1371.38,-1737.27) 1(-1371.38,-1737.27) 1(-1371.38,-1737.21) 1(-1371.38,-1737.21) 1(-1371.38,-1737.18) 1(-1371.38,-1737.18) 1(-1371.38,-1737.18) 1(-1371.38,-1737.18) 1(-1371.38,-1737.26) 1(-1371.38,-1737.26) 1(-1371.38,-1737.22) 1(-1371.38,-1737.22) 1(-1371.38,-1737.22) 1(-1371.38,-1737.22) 1(-1371.38,-1737.21) 1(-1371.38,-1737.21) 1(-1371.38,-1737.26) 1(-1371.38,-1737.26) 1(-1371.38,-1737.21) 1(-1371.38,-1737.21) 1(-1371.38,-1737.22) 1(-1371.38,-1737.22) 1(-1371.38,-1737.27) 1(-1371.38,-1737.27) 1(-1371.38,-1737.17) 1(-1371.38,-1737.17) 1(-1371.37,-1737.19) 1(-1371.37,-1737.19) 1(-1371.37,-1737.21) 1(-1371.37,-1737.21) 1(-1371.37,-1737.19) 1(-1371.37,-1737.19) 1(-1371.37,-1737.18) 1(-1371.37,-1737.18) 1(-1371.37,-1737.26) 1(-1371.37,-1737.26) 1(-1371.37,-1737.22) 1(-1371.37,-1737.22) 1(-1371.37,-1737.21) 1(-1371.37,-1737.21) 1(-1371.37,-1737.28) 1(-1371.37,-1737.28) 1(-1371.37,-1737.22) 1(-1371.37,-1737.22) 1(-1371.37,-1737.27) 1(-1371.37,-1737.27) 1(-1371.37,-1737.2) 1(-1371.37,-1737.2) 1(-1371.37,-1737.22) 1(-1371.37,-1737.22) 1(-1371.37,-1737.23) 1(-1371.37,-1737.23) 1(-1371.37,-1737.17) 1(-1371.37,-1737.17) 1(-1371.37,-1737.27) 1(-1371.37,-1737.27) 1(-1371.37,-1737.26) 1(-1371.37,-1737.26) 1(-1371.37,-1737.21) 1(-1371.37,-1737.21) 1(-1371.37,-1737.18) 1(-1371.37,-1737.18) 1(-1371.37,-1737.18) 1(-1371.37,-1737.18) 1(-1371.37,-1737.17) 1(-1371.37,-1737.17) 1(-1371.37,-1737.19) 1(-1371.37,-1737.19) 1(-1371.37,-1737.21) 1(-1371.37,-1737.21) 1(-1371.37,-1737.19) 1(-1371.37,-1737.19) 1(-1371.37,-1737.16) 1(-1371.37,-1737.16) 1(-1371.37,-1737.19) 1(-1371.37,-1737.19) 1(-1371.37,-1737.18) 1(-1371.37,-1737.18) 1(-1371.37,-1737.18) 1(-1371.37,-1737.18) 1(-1371.37,-1737.2) 1(-1371.37,-1737.2) 1(-1371.37,-1737.21) 1(-1371.37,-1737.21) 1(-1371.37,-1737.19) 1(-1371.37,-1737.19) 1(-1371.37,-1737.21) 1(-1371.37,-1737.21) 1(-1371.37,-1737.2) 1(-1371.37,-1737.2) 1(-1371.37,-1737.2) 1(-1371.37,-1737.2) 1(-1371.37,-1737.22) 1(-1371.37,-1737.22) 1(-1371.37,-1737.22) 1(-1371.37,-1737.22) 1(-1371.37,-1737.23) 1(-1371.37,-1737.23) 1(-1371.37,-1737.24) 1(-1371.37,-1737.24) 1(-1371.37,-1737.19) 1(-1371.37,-1737.19) 1(-1371.37,-1737.26) 1(-1371.37,-1737.26) 1(-1371.37,-1737.18) 1(-1371.37,-1737.18) 1(-1371.37,-1737.17) 1(-1371.37,-1737.17) 1(-1371.37,-1737.18) 1(-1371.37,-1737.18) 1(-1371.37,-1737.2) 1(-1371.37,-1737.2) 1(-1371.37,-1737.2) 1(-1371.37,-1737.2) 1(-1371.37,-1737.2) 1(-1371.37,-1737.2) 1(-1371.37,-1737.24) 1(-1371.37,-1737.24) 1(-1371.37,-1737.2) 1(-1371.37,-1737.2) 1(-1371.37,-1737.18) 1(-1371.37,-1737.18) 1(-1371.37,-1737.18) 1(-1371.37,-1737.18) 1(-1371.37,-1737.19) 1(-1371.37,-1737.19) 1(-1371.37,-1737.26) 1(-1371.37,-1737.26) 1(-1371.37,-1737.25) 1(-1371.37,-1737.25) 1(-1371.37,-1737.18) 1(-1371.37,-1737.18) 1(-1371.37,-1737.19) 1(-1371.37,-1737.19) 1(-1371.36,-1737.19) 1(-1371.36,-1737.19) 1(-1371.36,-1737.18) 1(-1371.36,-1737.18) 1(-1371.36,-1737.25) 1(-1371.36,-1737.25) 1(-1371.36,-1737.26) 1(-1371.36,-1737.26) 1(-1371.36,-1737.19) 1(-1371.36,-1737.19) 1(-1371.36,-1737.28) 1(-1371.36,-1737.28) 1(-1371.36,-1737.18) 1(-1371.36,-1737.18) 1(-1371.36,-1737.25) 1(-1371.36,-1737.25) 1(-1371.36,-1737.28) 1(-1371.36,-1737.28) 1(-1371.36,-1737.17) 1(-1371.36,-1737.17) 1(-1371.36,-1737.25) 1(-1371.36,-1737.25) 1(-1371.36,-1735.58) 1(-1371.36,-1735.58) 1(-1371.36,-1735.53) 1(-1371.36,-1735.53) 1(-1371.36,-1737.25) 1(-1371.36,-1737.25) 1(-1371.36,-1737.25) 1(-1371.36,-1737.25) 1(-1371.36,-1737.19) 1(-1371.36,-1737.19) 1(-1371.36,-1737.18) 1(-1371.36,-1737.18) 1(-1371.36,-1737.28) 1(-1371.36,-1737.28) 1(-1371.36,-1737.29) 1(-1371.36,-1737.29) 1(-1371.36,-1737.28) 1(-1371.36,-1737.28) 1(-1371.35,-1737.26) 1(-1371.35,-1737.26) 1(-1371.35,-1737.19) 1(-1371.35,-1737.19) 1(-1371.35,-1737.19) 1(-1371.35,-1737.19) 1(-1371.35,-1737.25) 1(-1371.35,-1737.25) 1(-1371.35,-1737.25) 1(-1371.35,-1737.25) 1(-1371.35,-1737.25) 1(-1371.35,-1737.25) 1(-1371.35,-1737.28) 1(-1371.35,-1737.28) 1(-1371.35,-1737.25) 1(-1371.35,-1737.25) 1(-1371.35,-1737.27) 1(-1371.35,-1737.27) 1(-1371.35,-1737.19) 1(-1371.35,-1737.19) 1(-1371.35,-1737.26) 1(-1371.35,-1737.26) 1(-1371.35,-1737.19) 1(-1371.35,-1737.19) 1(-1371.35,-1737.19) 1(-1371.35,-1737.19) 1(-1371.35,-1737.19) 1(-1371.35,-1737.19) 1(-1371.35,-1737.17) 1(-1371.35,-1737.17) 1(-1371.35,-1737.18) 1(-1371.35,-1737.18) 1(-1371.35,-1737.25) 1(-1371.35,-1737.25) 1(-1371.35,-1737.25) 1(-1371.35,-1737.25) 1(-1371.35,-1737.27) 1(-1371.35,-1737.27) 1(-1371.35,-1737.18) 1(-1371.35,-1737.18) 1(-1371.35,-1737.24) 1(-1371.35,-1737.24) 1(-1371.35,-1737.18) 1(-1371.35,-1737.18) 1(-1371.35,-1737.19) 1(-1371.35,-1737.19) 1(-1371.35,-1737.27) 1(-1371.35,-1737.27) 1(-1371.35,-1737.24) 1(-1371.35,-1737.24) 1(-1371.35,-1737.25) 1(-1371.35,-1737.25) 1(-1371.35,-1737.27) 1(-1371.35,-1737.27) 1(-1371.35,-1737.18) 1(-1371.35,-1737.18) 1(-1371.35,-1737.17) 1(-1371.35,-1737.17) 1(-1371.34,-1737.18) 1(-1371.34,-1737.18) 1(-1371.34,-1737.25) 1(-1371.34,-1737.25) 1(-1371.34,-1737.28) 1(-1371.34,-1737.28) 1(-1371.34,-1737.18) 1(-1371.34,-1737.18) 1(-1371.34,-1737.2) 1(-1371.34,-1737.2) 1(-1371.34,-1737.25) 1(-1371.34,-1737.25) 1(-1371.34,-1737.25) 1(-1371.34,-1737.25) 1(-1371.34,-1737.17) 1(-1371.34,-1737.17) 1(-1371.34,-1737.19) 1(-1371.34,-1737.19) 1(-1371.34,-1737.18) 1(-1371.34,-1737.18) 1(-1371.34,-1737.17) 1(-1371.34,-1737.17) 1(-1371.34,-1737.17) 1(-1371.34,-1737.17) 1(-1371.34,-1737.24) 1(-1371.34,-1737.24) 1(-1371.34,-1737.17) 1(-1371.34,-1737.17) 1(-1371.34,-1737.16) 1(-1371.34,-1737.16) 1(-1371.34,-1737.25) 1(-1371.34,-1737.25) 1(-1371.34,-1737.2) 1(-1371.34,-1737.2) 1(-1371.34,-1737.18) 1(-1371.34,-1737.18) 1(-1371.34,-1737.18) 1(-1371.34,-1737.18) 1(-1371.34,-1737.17) 1(-1371.34,-1737.17) 1(-1371.34,-1737.17) 1(-1371.34,-1737.17) 1(-1371.34,-1737.22) 1(-1371.34,-1737.22) 1(-1371.34,-1737.18) 1(-1371.34,-1737.18) 1(-1371.34,-1737.28) 1(-1371.34,-1737.28) 1(-1371.34,-1737.25) 1(-1371.34,-1737.25) 1(-1371.34,-1737.2) 1(-1371.34,-1737.2) 1(-1371.34,-1737.24) 1(-1371.34,-1737.24) 1(-1371.34,-1737.21) 1(-1371.34,-1737.21) 1(-1371.34,-1737.2) 1(-1371.34,-1737.2) 1(-1371.34,-1737.18) 1(-1371.34,-1737.18) 1(-1371.34,-1737.25) 1(-1371.34,-1737.25) 1(-1371.34,-1737.24) 1(-1371.34,-1737.24) 1(-1371.34,-1737.17) 1(-1371.34,-1737.17) 1(-1371.34,-1737.21) 1(-1371.34,-1737.21) 1(-1371.34,-1737.2) 1(-1371.34,-1737.2) 1(-1371.34,-1737.25) 1(-1371.34,-1737.25) 1(-1371.34,-1737.22) 1(-1371.34,-1737.22) 1(-1371.34,-1737.19) 1(-1371.34,-1737.19) 1(-1371.34,-1737.24) 1(-1371.34,-1737.24) 1(-1371.34,-1737.21) 1(-1371.34,-1737.21) 1(-1371.34,-1737.24) 1(-1371.34,-1737.24) 1(-1371.33,-1737.2) 1(-1371.33,-1737.2) 1(-1371.33,-1737.21) 1(-1371.33,-1737.21) 1(-1371.33,-1737.25) 1(-1371.33,-1737.25) 1(-1371.33,-1737.22) 1(-1371.33,-1737.22) 1(-1371.33,-1737.21) 1(-1371.33,-1737.21) 1(-1371.33,-1737.24) 1(-1371.33,-1737.24) 1(-1371.33,-1737.23) 1(-1371.33,-1737.23) 1(-1371.33,-1737.18) 1(-1371.33,-1737.18) 1(-1371.33,-1737.29) 1(-1371.33,-1737.29) 1(-1371.33,-1737.23) 1(-1371.33,-1737.23) 1(-1371.33,-1737.22) 1(-1371.33,-1737.22) 1(-1371.33,-1737.22) 1(-1371.33,-1737.22) 1(-1371.33,-1737.22) 1(-1371.33,-1737.22) 1(-1371.33,-1737.16) 1(-1371.33,-1737.16) 1(-1371.33,-1737.29) 1(-1371.33,-1737.29) 1(-1371.33,-1737.23) 1(-1371.33,-1737.23) 1(-1371.33,-1737.25) 1(-1371.33,-1737.25) 1(-1371.33,-1737.25) 1(-1371.33,-1737.25) 1(-1371.33,-1737.22) 1(-1371.33,-1737.22) 1(-1371.33,-1737.23) 1(-1371.33,-1737.23) 1(-1371.33,-1737.19) 1(-1371.33,-1737.19) 1(-1371.33,-1737.18) 1(-1371.33,-1737.18) 1(-1371.33,-1737.18) 1(-1371.33,-1737.18) 1(-1371.32,-1737.28) 1(-1371.32,-1737.28) 1(-1371.32,-1737.18) 1(-1371.32,-1737.18) 1(-1371.32,-1737.25) 1(-1371.32,-1737.25) 1(-1371.32,-1737.25) 1(-1371.32,-1737.25) 1(-1371.32,-1737.16) 1(-1371.32,-1737.16) 1(-1371.32,-1737.19) 1(-1371.32,-1737.19) 1(-1371.32,-1737.28) 1(-1371.32,-1737.28) 1(-1371.32,-1737.25) 1(-1371.32,-1737.25) 1(-1371.32,-1737.17) 1(-1371.32,-1737.17) 1(-1371.32,-1737.28) 1(-1371.32,-1737.28) 1(-1371.32,-1737.25) 1(-1371.32,-1737.25) 1(-1371.32,-1737.19) 1(-1371.32,-1737.19) 1(-1371.32,-1737.25) 1(-1371.32,-1737.25) 1(-1371.32,-1737.16) 1(-1371.32,-1737.16) 1(-1371.32,-1737.27) 1(-1371.32,-1737.27) 1(-1371.32,-1737.25) 1(-1371.32,-1737.25) 1(-1371.31,-1737.27) 1(-1371.31,-1737.27) 1(-1371.31,-1737.26) 1(-1371.31,-1737.26) 1(-1371.31,-1737.25) 1(-1371.31,-1737.25) 1(-1371.31,-1737.25) 1(-1371.31,-1737.25) 1(-1371.31,-1737.18) 1(-1371.31,-1737.18) 1(-1371.31,-1737.18) 1(-1371.31,-1737.18) 1(-1371.31,-1737.17) 1(-1371.31,-1737.17) 1(-1371.31,-1737.16) 1(-1371.31,-1737.16) 1(-1371.31,-1737.25) 1(-1371.31,-1737.25) 1(-1371.31,-1737.19) 1(-1371.31,-1737.19) 1(-1371.31,-1737.18) 1(-1371.31,-1737.18) 1(-1371.31,-1737.18) 1(-1371.31,-1737.18) 1(-1371.31,-1737.17) 1(-1371.31,-1737.17) 1(-1371.31,-1737.26) 1(-1371.31,-1737.26) 1(-1371.31,-1737.18) 1(-1371.31,-1737.18) 1(-1371.31,-1737.17) 1(-1371.31,-1737.17) 1(-1371.31,-1737.27) 1(-1371.31,-1737.27) 1(-1371.31,-1737.28) 1(-1371.31,-1737.28) 1(-1371.31,-1737.19) 1(-1371.31,-1737.19) 1(-1371.31,-1737.17) 1(-1371.31,-1737.17) 1(-1371.31,-1737.18) 1(-1371.31,-1737.18) 1(-1371.31,-1737.29) 1(-1371.31,-1737.29) 1(-1371.31,-1737.18) 1(-1371.31,-1737.18) 1(-1371.31,-1737.26) 1(-1371.31,-1737.26) 1(-1371.31,-1737.19) 1(-1371.31,-1737.19) 1(-1371.31,-1737.19) 1(-1371.31,-1737.19) 1(-1371.31,-1737.25) 1(-1371.31,-1737.25) 1(-1371.31,-1737.18) 1(-1371.31,-1737.18) 1(-1371.31,-1737.16) 1(-1371.31,-1737.16) 1(-1371.31,-1737.28) 1(-1371.31,-1737.28) 1(-1371.31,-1737.25) 1(-1371.31,-1737.25) 1(-1371.31,-1737.18) 1(-1371.31,-1737.18) 1(-1371.31,-1737.2) 1(-1371.31,-1737.2) 1(-1371.31,-1737.16) 1(-1371.31,-1737.16) 1(-1371.31,-1737.19) 1(-1371.31,-1737.19) 1(-1371.31,-1737.25) 1(-1371.31,-1737.25) 1(-1371.31,-1737.18) 1(-1371.31,-1737.18) 1(-1371.31,-1737.27) 1(-1371.31,-1737.27) 1(-1371.31,-1737.28) 1(-1371.31,-1737.28) 1(-1371.31,-1737.2) 1(-1371.31,-1737.2) 1(-1371.31,-1737.26) 1(-1371.31,-1737.26) 1(-1371.31,-1737.26) 1(-1371.31,-1737.26) 1(-1371.31,-1737.2) 1(-1371.31,-1737.2) 1(-1371.31,-1737.27) 1(-1371.31,-1737.27) 1(-1371.31,-1737.16) 1(-1371.31,-1737.16) 1(-1371.31,-1737.19) 1(-1371.31,-1737.19) 1(-1371.31,-1737.18) 1(-1371.31,-1737.18) 1(-1371.31,-1737.25) 1(-1371.31,-1737.25) 1(-1371.31,-1737.25) 1(-1371.31,-1737.25) 1(-1371.31,-1737.27) 1(-1371.31,-1737.27) 1(-1371.31,-1737.19) 1(-1371.31,-1737.19) 1(-1371.3,-1737.2) 1(-1371.3,-1737.2) 1(-1371.3,-1737.27) 1(-1371.3,-1737.27) 1(-1371.3,-1737.25) 1(-1371.3,-1737.25) 1(-1371.3,-1737.18) 1(-1371.3,-1737.18) 1(-1371.3,-1737.19) 1(-1371.3,-1737.19) 1(-1371.3,-1737.2) 1(-1371.3,-1737.2) 1(-1371.3,-1737.25) 1(-1371.3,-1737.25) 1(-1371.3,-1737.18) 1(-1371.3,-1737.18) 1(-1371.3,-1737.16) 1(-1371.3,-1737.16) 1(-1371.3,-1737.2) 1(-1371.3,-1737.2) 1(-1371.3,-1737.19) 1(-1371.3,-1737.19) 1(-1371.3,-1737.25) 1(-1371.3,-1737.25) 1(-1371.3,-1737.18) 1(-1371.3,-1737.18) 1(-1371.3,-1737.19) 1(-1371.3,-1737.19) 1(-1371.3,-1737.28) 1(-1371.3,-1737.28) 1(-1371.3,-1737.27) 1(-1371.3,-1737.27) 1(-1371.3,-1737.25) 1(-1371.3,-1737.25) 1(-1371.3,-1737.16) 1(-1371.3,-1737.16) 1(-1371.3,-1737.18) 1(-1371.3,-1737.18) 1(-1371.3,-1737.2) 1(-1371.3,-1737.2) 1(-1371.3,-1737.17) 1(-1371.3,-1737.17) 1(-1371.3,-1737.16) 1(-1371.3,-1737.16) 1(-1371.3,-1737.17) 1(-1371.3,-1737.17) 1(-1371.3,-1737.19) 1(-1371.3,-1737.19) 1(-1371.3,-1737.19) 1(-1371.3,-1737.19) 1(-1371.3,-1737.18) 1(-1371.3,-1737.18) 1(-1371.3,-1737.2) 1(-1371.3,-1737.2) 1(-1371.3,-1737.28) 1(-1371.3,-1737.28) 1(-1371.3,-1737.19) 1(-1371.3,-1737.19) 1(-1371.3,-1737.2) 1(-1371.3,-1737.2) 1(-1371.3,-1737.19) 1(-1371.3,-1737.19) 1(-1371.3,-1737.18) 1(-1371.3,-1737.18) 1(-1371.29,-1737.2) 1(-1371.29,-1737.2) 1(-1371.29,-1737.18) 1(-1371.29,-1737.18) 1(-1371.29,-1737.17) 1(-1371.29,-1737.17) 1(-1371.29,-1737.25) 1(-1371.29,-1737.25) 1(-1371.29,-1737.16) 1(-1371.29,-1737.16) 1(-1371.29,-1737.18) 1(-1371.29,-1737.18) 1(-1371.29,-1737.25) 1(-1371.29,-1737.25) 1(-1371.29,-1737.2) 1(-1371.29,-1737.2) 1(-1371.29,-1737.2) 1(-1371.29,-1737.2) 1(-1371.29,-1737.18) 1(-1371.29,-1737.18) 1(-1371.29,-1737.19) 1(-1371.29,-1737.19) 1(-1371.29,-1737.18) 1(-1371.29,-1737.18) 1(-1371.29,-1737.2) 1(-1371.29,-1737.2) 1(-1371.29,-1737.16) 1(-1371.29,-1737.16) 1(-1371.29,-1737.16) 1(-1371.29,-1737.16) 1(-1371.29,-1737.28) 1(-1371.29,-1737.28) 1(-1371.29,-1737.21) 1(-1371.29,-1737.21) 1(-1371.29,-1737.2) 1(-1371.29,-1737.2) 1(-1371.29,-1737.2) 1(-1371.29,-1737.2) 1(-1371.29,-1737.19) 1(-1371.29,-1737.19) 1(-1371.29,-1737.18) 1(-1371.29,-1737.18) 1(-1371.29,-1737.18) 1(-1371.29,-1737.18) 1(-1371.29,-1737.16) 1(-1371.29,-1737.16) 1(-1371.29,-1737.16) 1(-1371.29,-1737.16) 1(-1371.29,-1737.21) 1(-1371.29,-1737.21) 1(-1371.29,-1737.27) 1(-1371.29,-1737.27) 1(-1371.29,-1737.16) 1(-1371.29,-1737.16) 1(-1371.29,-1737.18) 1(-1371.29,-1737.18) 1(-1371.29,-1737.21) 1(-1371.29,-1737.21) 1(-1371.29,-1737.19) 1(-1371.29,-1737.19) 1(-1371.29,-1737.18) 1(-1371.29,-1737.18) 1(-1371.29,-1737.2) 1(-1371.29,-1737.2) 1(-1371.29,-1737.15) 1(-1371.29,-1737.15) 1(-1371.29,-1737.24) 1(-1371.29,-1737.24) 1(-1371.29,-1737.2) 1(-1371.29,-1737.2) 1(-1371.29,-1737.18) 1(-1371.29,-1737.18) 1(-1371.29,-1737.2) 1(-1371.29,-1737.2) 1(-1371.29,-1737.18) 1(-1371.29,-1737.18) 1(-1371.29,-1737.15) 1(-1371.29,-1737.15) 1(-1371.29,-1737.14) 1(-1371.29,-1737.14) 1(-1371.29,-1737.25) 1(-1371.29,-1737.25) 1(-1371.29,-1737.22) 1(-1371.29,-1737.22) 1(-1371.29,-1737.28) 1(-1371.29,-1737.28) 1(-1371.28,-1737.22) 1(-1371.28,-1737.22) 1(-1371.28,-1737.18) 1(-1371.28,-1737.18) 1(-1371.28,-1737.15) 1(-1371.28,-1737.15) 1(-1371.28,-1737.18) 1(-1371.28,-1737.18) 1(-1371.28,-1737.17) 1(-1371.28,-1737.17) 1(-1371.28,-1737.16) 1(-1371.28,-1737.16) 1(-1371.28,-1737.15) 1(-1371.28,-1737.15) 1(-1371.28,-1737.17) 1(-1371.28,-1737.17) 1(-1371.28,-1737.2) 1(-1371.28,-1737.2) 1(-1371.28,-1737.19) 1(-1371.28,-1737.19) 1(-1371.28,-1737.17) 1(-1371.28,-1737.17) 1(-1371.28,-1737.21) 1(-1371.28,-1737.21) 1(-1371.28,-1737.16) 1(-1371.28,-1737.16) 1(-1371.28,-1737.18) 1(-1371.28,-1737.18) 1(-1371.28,-1737.14) 1(-1371.28,-1737.14) 1(-1371.28,-1737.24) 1(-1371.28,-1737.24) 1(-1371.28,-1737.2) 1(-1371.28,-1737.2) 1(-1371.28,-1737.16) 1(-1371.28,-1737.16) 1(-1371.28,-1737.24) 1(-1371.28,-1737.24) 1(-1371.28,-1737.22) 1(-1371.28,-1737.22) 1(-1371.28,-1737.17) 1(-1371.28,-1737.17) 1(-1371.28,-1737.19) 1(-1371.28,-1737.19) 1(-1371.28,-1737.14) 1(-1371.28,-1737.14) 1(-1371.28,-1737.23) 1(-1371.28,-1737.23) 1(-1371.28,-1737.19) 1(-1371.28,-1737.19) 1(-1371.28,-1737.22) 1(-1371.28,-1737.22) 1(-1371.28,-1737.23) 1(-1371.28,-1737.23) 1(-1371.28,-1737.16) 1(-1371.28,-1737.16) 1(-1371.28,-1737.23) 1(-1371.28,-1737.23) 1(-1371.28,-1737.27) 1(-1371.28,-1737.27) 1(-1371.28,-1737.22) 1(-1371.28,-1737.22) 1(-1371.28,-1737.14) 1(-1371.28,-1737.14) 1(-1371.28,-1737.24) 1(-1371.28,-1737.24) 1(-1371.28,-1737.19) 1(-1371.28,-1737.19) 1(-1371.28,-1737.17) 1(-1371.28,-1737.17) 1(-1371.28,-1737.18) 1(-1371.28,-1737.18) 1(-1371.28,-1737.16) 1(-1371.28,-1737.16) 1(-1371.28,-1737.27) 1(-1371.28,-1737.27) 1(-1371.28,-1737.16) 1(-1371.28,-1737.16) 1(-1371.28,-1737.23) 1(-1371.28,-1737.23) 1(-1371.28,-1737.14) 1(-1371.28,-1737.14) 1(-1371.28,-1737.28) 1(-1371.28,-1737.28) 1(-1371.28,-1737.27) 1(-1371.28,-1737.27) 1(-1371.28,-1737.27) 1(-1371.28,-1737.27) 1(-1371.28,-1737.17) 1(-1371.28,-1737.17) 1(-1371.28,-1737.16) 1(-1371.28,-1737.16) 1(-1371.28,-1737.18) 1(-1371.28,-1737.18) 1(-1371.27,-1737.19) 1(-1371.27,-1737.19) 1(-1371.27,-1737.16) 1(-1371.27,-1737.16) 1(-1371.27,-1737.27) 1(-1371.27,-1737.27) 1(-1371.27,-1737.14) 1(-1371.27,-1737.14) 1(-1371.27,-1737.19) 1(-1371.27,-1737.19) 1(-1371.27,-1737.27) 1(-1371.27,-1737.27) 1(-1371.27,-1737.27) 1(-1371.27,-1737.27) 1(-1371.27,-1737.17) 1(-1371.27,-1737.17) 1(-1371.27,-1737.16) 1(-1371.27,-1737.16) 1(-1371.27,-1737.27) 1(-1371.27,-1737.27) 1(-1371.27,-1737.19) 1(-1371.27,-1737.19) 1(-1371.27,-1737.18) 1(-1371.27,-1737.18) 1(-1371.27,-1737.16) 1(-1371.27,-1737.16) 1(-1371.27,-1737.27) 1(-1371.27,-1737.27) 1(-1371.27,-1737.27) 1(-1371.27,-1737.27) 1(-1371.27,-1737.17) 1(-1371.27,-1737.17) 1(-1371.27,-1737.18) 1(-1371.27,-1737.18) 1(-1371.27,-1737.15) 1(-1371.27,-1737.15) 1(-1371.27,-1737.19) 1(-1371.27,-1737.19) 1(-1371.27,-1737.19) 1(-1371.27,-1737.19) 1(-1371.27,-1737.14) 1(-1371.27,-1737.14) 1(-1371.27,-1737.15) 1(-1371.27,-1737.15) 1(-1371.27,-1737.18) 1(-1371.27,-1737.18) 1(-1371.27,-1737.15) 1(-1371.27,-1737.15) 1(-1371.27,-1737.2) 1(-1371.27,-1737.2) 1(-1371.27,-1737.2) 1(-1371.27,-1737.2) 1(-1371.27,-1737.2) 1(-1371.27,-1737.2) 1(-1371.27,-1737.19) 1(-1371.27,-1737.19) 1(-1371.27,-1737.17) 1(-1371.27,-1737.17) 1(-1371.27,-1737.14) 1(-1371.27,-1737.14) 1(-1371.26,-1735.53) 1(-1371.26,-1735.53) 1(-1371.25,-1735.58) 1(-1371.25,-1735.58) 1(-1371.25,-1735.53) 1(-1371.25,-1735.53) 1(-1371.23,-1735.58) 1(-1371.23,-1735.58) 1(-1371.23,-1735.53) 1(-1371.23,-1735.53) 1(-1371.23,-1736.24) 1(-1371.23,-1736.24) 1(-1371.23,-1735.98) 1(-1371.23,-1735.98) 1(-1371.23,-1735.95) 1(-1371.23,-1735.95) 1(-1371.23,-1735.69) 1(-1371.23,-1735.69) 1(-1371.13,-1735.53) 1(-1371.13,-1735.53) 1(-1371.13,-1735.58) 1(-1371.13,-1735.58) 1(-1371.13,-1735.53) 1(-1371.13,-1735.53) 1(-1371.11,-1736.24) 1(-1371.11,-1736.24) 1(-1371.11,-1735.98) 1(-1371.11,-1735.98) 1(-1371.11,-1735.95) 1(-1371.11,-1735.95) 1(-1371.11,-1735.69) 1(-1371.11,-1735.69) 1(-1371.07,-1735.45) 1(-1371.07,-1735.45) 1(-1371.03,-1735.41) 1(-1371.03,-1735.41) 1(-1371.03,-1735.35) 1(-1371.03,-1735.35) 1(-1371.03,-1735.33) 1(-1371.03,-1735.33) 1(-1371.03,-1735.28) 1(-1371.03,-1735.28) 1(-1371.02,-1735.41) 1(-1371.02,-1735.35) 1(-1371.02,-1735.35) 1(-1371.02,-1735.33) 1(-1371.02,-1735.33) 1(-1371.02,-1735.28) 1(-1370.98,-1736.24) 1(-1370.98,-1736.24) 1(-1370.98,-1736.13) 1(-1370.98,-1736.13) 1(-1370.95,-1736.13) 1(-1370.95,-1736.13) 1(-1370.95,-1735.89) 1(-1370.95,-1735.89) 1(-1370.9,-1735.34) 1(-1370.87,-1735.36) 1(-1370.87,-1735.36) 1(-1370.87,-1735.34) 1(-1370.87,-1735.33) 1(-1370.87,-1735.33) 1(-1370.86,-1735.34) 1(-1370.79,-1736.24) 1(-1370.79,-1735.89) 1(-1370.73,-1735.41) 1(-1370.73,-1735.41) 1(-1370.73,-1735.39) 1(-1370.73,-1735.3) 1(-1370.73,-1735.28) 1(-1370.73,-1735.28) 1(-1370.65,-1736.24) 1(-1370.65,-1735.89) 1(-1370.55,-1736.24) 1(-1370.55,-1735.89) 1(-1370.41,-1736.24) 1(-1370.41,-1736.24) 1(-1370.41,-1735.89) 1(-1370.41,-1735.89)
  round 0.04 on Mech6: 1(-1373.3,-1735.23) 1(-1373.04,-1737.57) 1(-1372.72,-1737.03) 1(-1372.53,-1735.55) 1(-1372.49,-1737.56) 1(-1372.17,-1737.02) 1(-1371.94,-1737.56) 1(-1371.62,-1737.02) 1(-1371.37,-1737.56) 1(-1371.05,-1737.03)
  round 0.02 on Mech15: 1(-1373.3,-1735.21) 1(-1373.04,-1737.55) 1(-1372.73,-1737.05) 1(-1372.55,-1735.53) 1(-1372.48,-1737.54) 1(-1372.17,-1737.04) 1(-1371.93,-1737.54) 1(-1371.62,-1737.04) 1(-1371.36,-1737.54) 1(-1371.05,-1737.05)
  round 0 on Mech4: 1(-1372.39,-1735.57) 1(-1372.39,-1735.57) 1(-1372.39,-1735.44) 1(-1372.39,-1735.44) 1(-1372.3,-1735.56) 1(-1372.29,-1735.57) 1(-1372.29,-1735.57) 1(-1372.29,-1735.44) 1(-1372.29,-1735.44)
  round 0.02 on Mech4: 1(-1372.3,-1735.56)
  round 0 on Mech14: 1(-1371.24,-1735.2) 1(-1371.24,-1735.2) 1(-1371.24,-1735.09) 1(-1371.24,-1735.09) 1(-1371.24,-1735.23) 1(-1371.24,-1735.23) 1(-1371.24,-1735.2) 1(-1371.24,-1735.2) 1(-1371.24,-1735.09) 1(-1371.24,-1735.09) 1(-1371.24,-1735.06) 1(-1371.24,-1735.06) 1(-1371.18,-1735.23) 1(-1371.18,-1735.23) 1(-1371.18,-1735.2) 1(-1371.18,-1735.2) 1(-1371.18,-1735.09) 1(-1371.18,-1735.09) 1(-1371.18,-1735.06) 1(-1371.18,-1735.06) 1(-1371.17,-1735.2) 1(-1371.17,-1735.2) 1(-1371.17,-1735.09) 1(-1371.17,-1735.09) 1(-1371,-1735.21) 1(-1371,-1735.21) 1(-1371,-1735.09) 1(-1371,-1735.09) 1(-1370.99,-1735.23) 1(-1370.99,-1735.23) 1(-1370.99,-1735.2) 1(-1370.99,-1735.2) 1(-1370.99,-1735.1) 1(-1370.99,-1735.1) 1(-1370.99,-1735.07) 1(-1370.99,-1735.07) 1(-1370.93,-1735.23) 1(-1370.93,-1735.23) 1(-1370.93,-1735.2) 1(-1370.93,-1735.2) 1(-1370.93,-1735.1) 1(-1370.93,-1735.1) 1(-1370.93,-1735.07) 1(-1370.93,-1735.07) 1(-1370.92,-1735.21) 1(-1370.92,-1735.21) 1(-1370.92,-1735.09) 1(-1370.92,-1735.09)
  round 0.02 on Mech5: 1(-1371.21,-1735.15) 1(-1370.96,-1735.15)
  round 0 on Mech9: 1(-1370.99,-1736.33) 1(-1370.99,-1736.33) 1(-1370.99,-1735.8) 1(-1370.99,-1735.8) 1(-1370.68,-1736.08) 1(-1370.68,-1736.05) 1(-1370.66,-1736.07) 1(-1370.4,-1736.33) 1(-1370.4,-1736.33) 1(-1370.4,-1735.8) 1(-1370.4,-1735.8)
  round 0 on Mech8: 1(-1370.98,-1736.24) 1(-1370.98,-1736.24) 1(-1370.98,-1736.13) 1(-1370.98,-1736.13) 1(-1370.95,-1736.13) 1(-1370.95,-1736.13) 1(-1370.95,-1735.89) 1(-1370.95,-1735.89) 1(-1370.87,-1736.31) 1(-1370.87,-1736.31) 1(-1370.87,-1736.24) 1(-1370.87,-1735.89) 1(-1370.87,-1735.82) 1(-1370.87,-1735.82) 1(-1370.82,-1736.31) 1(-1370.82,-1736.31) 1(-1370.82,-1736.24) 1(-1370.82,-1735.89) 1(-1370.82,-1735.82) 1(-1370.82,-1735.82) 1(-1370.57,-1736.31) 1(-1370.57,-1736.31) 1(-1370.57,-1736.24) 1(-1370.57,-1735.89) 1(-1370.57,-1735.82) 1(-1370.57,-1735.82) 1(-1370.41,-1736.24) 1(-1370.41,-1736.24) 1(-1370.41,-1735.89) 1(-1370.41,-1735.89)
  round 0 on Mech10: 1(-1370.98,-1736.24) 1(-1370.98,-1736.24) 1(-1370.98,-1736.13) 1(-1370.98,-1736.13) 1(-1370.95,-1736.13) 1(-1370.95,-1736.13) 1(-1370.95,-1735.89) 1(-1370.95,-1735.89) 1(-1370.87,-1736.31) 1(-1370.87,-1736.31) 1(-1370.87,-1736.24) 1(-1370.87,-1735.89) 1(-1370.87,-1735.82) 1(-1370.87,-1735.82) 1(-1370.82,-1736.31) 1(-1370.82,-1736.31) 1(-1370.82,-1736.24) 1(-1370.82,-1735.89) 1(-1370.82,-1735.82) 1(-1370.82,-1735.82) 1(-1370.57,-1736.31) 1(-1370.57,-1736.31) 1(-1370.57,-1736.24) 1(-1370.57,-1735.89) 1(-1370.57,-1735.82) 1(-1370.57,-1735.82) 1(-1370.41,-1736.24) 1(-1370.41,-1736.24) 1(-1370.41,-1735.89) 1(-1370.41,-1735.89)
  round 0 on Mech7: 1(-1370.86,-1734.95) 1(-1370.56,-1734.95)

## Via types
v1: diameter 23.62, hole 11.81, Top Layer to Bottom Layer, tented both sides, 128 vias
v2: diameter 23.62, hole 11.81, Top Layer to Bottom Layer, 122 vias

## Nets (pads, with @x,y where several pads share a name; then routed paths per layer and width w, separated by ;. In a path a pad name is that pad's centre, name@x,y a point inside that pad or via, vN(x,y) a via of type N, cw(c..) or ccw(c..) an arc to the next point about the centre after c; other vN are vias at no path point)
3V3: C4.2 C5.2 C6.2 C7.2 C8.2 C9.2 C10.2 C11.2 C12.2 C13.2 C14.2 C19.1 C44.2 C45.2 CS_H.1 CS_H.8 DIO.9 DIO.24 DIO.36 DIO.48 GND.2@1439.84,3198.82 JP1.4 R2.2 R7.2 R8.2 R90.2 U3.4 U15.2 U15.4 | length 10448.4
  Top Layer w10: v1(310,2245) 311.89,2246.89 365.83,2246.89 R2.2@367.72,2248.77 ; C13.2@747.22,3066.2 C14.2@747.22,3126.2 746.85,3126.57 746.85,3165.23 ; DIO.36@821.99,2708.6 753.88,2708.6 C11.2@751.74,2710.73 C12.2@693.24,2710.73 C10.2@634.74,2710.73 634.74,2760.39 662.68,2788.32 JP1.4@662.68,2798.2 605,2855.88 605,3136.44 633.79,3165.23 746.85,3165.23 ; DIO.24@880.06,2983.2 880.06,3063.99 C4.2@881.27,3065.2 C5.2@881.27,3125.2 881.27,3151.68 867.72,3165.23 746.85,3165.23 ; DIO.48@1096.59,2650.53 1096.59,2649.2 1097.43,2648.36 1111.64,2648.36 1178.58,2581.42 1298.58,2581.42 1356.74,2523.26 C8.2@1356.74,2492.26 C9.2@1299.74,2492.26 1299.74,2523.26 1290.61,2532.39 1277.61,2532.39 v1(1275,2535) ; DIO.9@1155.01,2866.42 1184.52,2866.42 1205.01,2886.91 1205.01,2907.63 1222.58,2925.2 C7.2@1251.5,2925.2 C6.2@1251.5,2982.2 ; v1(1210,2980) 1249.3,2980 C6.2@1251.5,2982.2 ; GND.2@1439.84,3195 1410,3195 1370,3155 1370,3040 1345,3015 1261.06,3015 1253.15,3007.09 1253.15,2983.85 C6.2@1251.5,2982.2 ; v1(2205,3245) 2225,3225 2252.72,3225 ; R7.2@2252.72,3181.99 2252.72,3225 ; C19.1@2325.72,2758.47 2426.53,2758.47 2540,2645 U3.4@2540,2597.68 2540,2550 2380,2390 2380,2270 ; CS_H.1@2380,1937.3 2380,2270 ; R8.2@2511.07,3181.99 2508.04,3185.01 2508.04,3201.96 2485,3225 2252.72,3225 ; R90.2@2845,2274.22 2384.22,2274.22 2380,2270
  Top Layer w30: CS_H.8@1680,1937.3 1735,1882.3 v2(1735,1850)
  Bottom Layer w30: v1(310,2245) 385.19,2320.19 386.75,2320.19 467.18,2400.63 662.68,2596.13 JP1.4@662.68,2798.2 600,2860.88 600,3156 664,3220 1085,3220 1210,3095 v1(1210,2980) ; 1575,1885 1575,2050 1275,2350 1275,2443.83 1277.08,2445.91 1277.08,2515.69 1276.65,2516.12 1276.65,2533.35 v1(1275,2535) 1225,2535 1154.66,2605.34 1154.66,2909.66 1208.54,2963.54 1208.54,2978.54 v1(1210,2980) ; 1580,1880 1580,1879.77 1654.77,1805 1735,1805 ; v2(1735,1850) 1735,1805 ; C45.2@2173.49,2082.53 2173.49,2153.49 2191.07,2171.07 2243.94,2171.07 C44.2@2244.88,2172 2244.88,2164.47 2256.63,2152.72 2339.12,2152.72 U15.2@2341.84,2150 U15.4@2572.55,2150 2572.55,2032.55 2477.3,1937.3 CS_H.1@2380,1937.3 2380,1880 2305,1805 1735,1805 ; v1(2205,3245) 2195,3255 1585,3255 1310,2980 v1(1210,2980)